# Altium PCB MacroPlay.PcbDoc (part 2 of 2)
Units mm, origin at the board's own origin, x right, y up, seen from the top; angles counter-clockwise.
Board outline 100 x 85.02 mm, 2 copper layers (Top Layer, Bottom Layer), stack 1.569 mm thick; 92 components, 57 nets, 335 pads, 121 vias.
Unrouted connection lines stored in the file: 18.
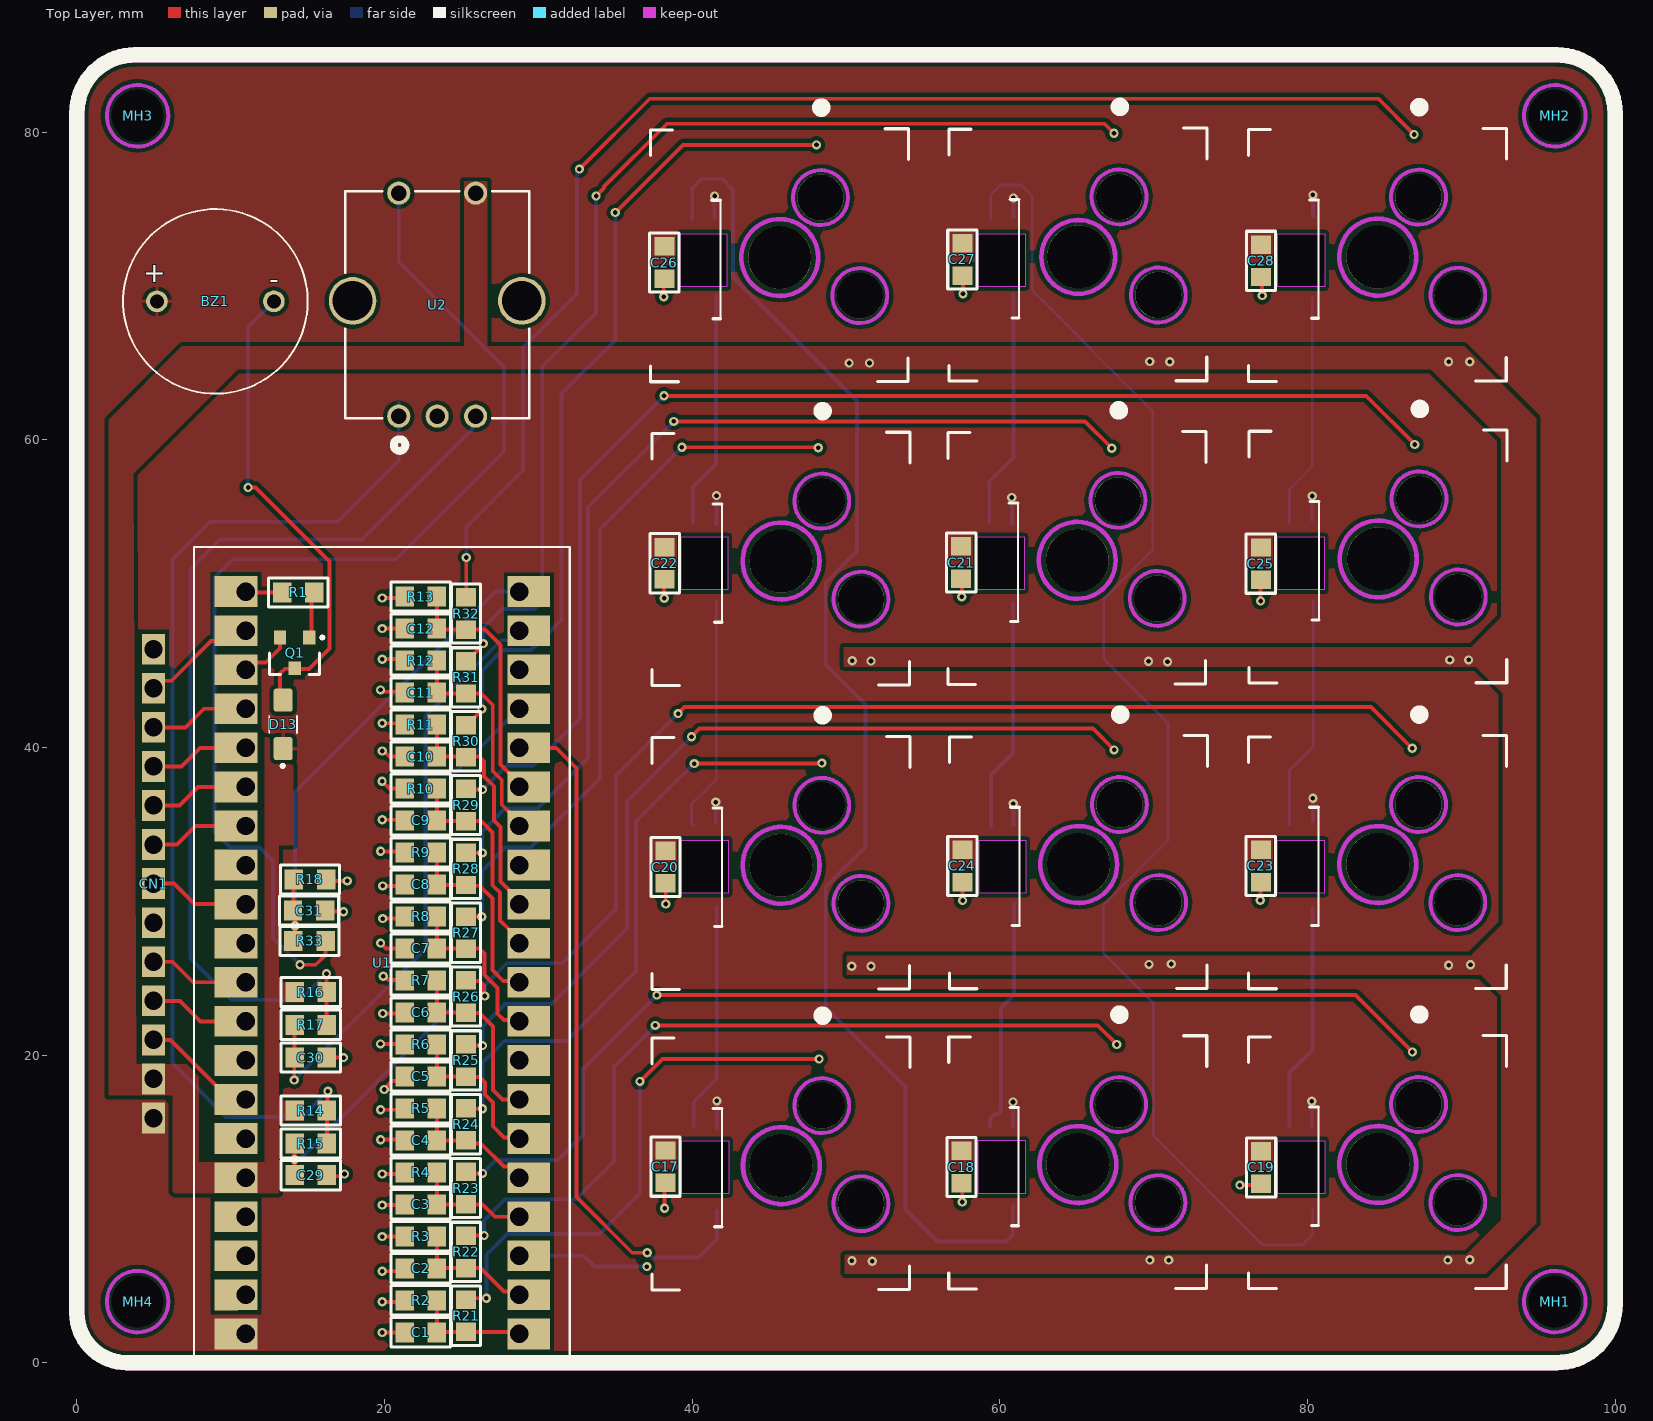
[diagram p0: Top Layer view]

## Via types
v1: diameter 0.6, hole 0.3, Top Layer to Bottom Layer, tented both sides, 85 vias
v2: diameter 0.6, hole 0.3, Top Layer to Bottom Layer, tented top, 36 vias

## Nets (pads, with @x,y where several pads share a name; then routed paths per layer and width w, separated by ;. In a path a pad name is that pad's centre, name@x,y a point inside that pad or via, vN(x,y) a via of type N, cw(c..) or ccw(c..) an arc to the next point about the centre after c; other vN are vias at no path point) (continued)
NetBZ1_N: (continued)
  Top Layer w0.254: v1(11.125,56.9) 11.6,56.9 16.414,52.086 16.414,46.439 15.09,45.115 14.185,45.115 Q1.3 14.118,45.118 13.518,45.118 13.2,44.8 13.2,43.275 D13.2
  Bottom Layer w0.254: v1(11.125,56.9) 11.125,67.325 BZ1.N
NetD1_4: D1.4 U1.GP12 | length 45.2
  Top Layer w0.254: U1.GP12@28.75,39.975 30.016,39.975 31.158,39.975 32.483,38.65 32.483,10.767 36.1,7.15 v1(37.075,7.15)
  Bottom Layer w0.254: v1(37.075,7.15) 37.102,7.15 37.397,6.855 40.406,6.855 41.6,8.049 D1.4@41.6,9.877
NetQ1_1: Q1.1 R1.2 | length 3.1
  Top Layer w0.254: Q1.1 15.25,47.3 15.25,49.892 R1.2
NetR1_1: R1.1 U1.GP16 | length 2.4
  Top Layer w0.254: U1.GP16@10.97,50.135 11.03,50.075 R1.1
NetR14_1: R14.1 R15.2 U2.A | length 69.6
  Top Layer w0.254: R15.2 R14.1 16.3,16.45 v1@16.3,17.675
  Bottom Layer w0.254: v1(16.315,17.66) 14.634,15.98 9.695,15.98 6.2,19.475 6.2,52.225 8.65,54.675 16.95,54.675 20.92,58.645 20.92,62.394
NetR16_1: R16.1 R17.2 U2.B | length 63.2
  Top Layer w0.254: v1(16.224,25.293) 16.224,22.641 16.245,22.62 R17.2
  Bottom Layer w0.254: v1(16.224,25.293) 14.531,23.6 10.058,23.6 7.375,26.283 7.375,51.6 9.3,53.525 18.525,53.525 25.683,60.683 25.683,61.301 U2.B ; U2.B@25.619,62.088 25.638,62.069 U2.B@25.638,61.238
NetR21_2: R21.2 SW1.1 | length 35.3
  Top Layer w0.254: R21.2 25.382,4.195 v1(26.62,4.195) ; v1(36.595,18.29) 38.054,19.75 v2@48.225,19.75
  Bottom Layer w0.254: v1(26.62,4.195) 26.62,7.02 27.96,8.36 33.96,8.36 36.595,10.995 v1(36.595,18.29)
  other v2: 48.244,19.75
NetR22_2: R22.2 SW2.1 | length 52.7
  Top Layer w0.254: R22.2 25.307,8.27 v1(26.47,8.27) ; v1(37.6,21.933) 66.36,21.933 v2(67.6,20.693)
  Bottom Layer w0.254: v1(26.47,8.27) 26.47,9.262 27.838,10.63 32.455,10.63 34.9,13.075 34.9,19.233 v1(37.6,21.933)
NetR23_2: R23.2 SW3.1 | length 70.4
  Top Layer w0.254: R23.2 25.391,12.312 v1(26.368,12.312) ; v1(37.7,23.9) 83.122,23.9 v2@86.825,20.197
  Bottom Layer w0.254: v1(26.368,12.312) 27.226,13.17 31.27,13.17 32.9,14.8 32.9,19.1 v1(37.7,23.9)
  other v2: 86.818,20.204
NetR24_2: R24.2 SW4.1 | length 39.9
  Top Layer w0.254: R24.2 25.341,16.512 v1(26.358,16.512) ; v1(40.125,38.95) 40.141,38.966 48.416,38.966 v2@48.425,38.975
  Bottom Layer w0.254: v1(26.358,16.512) 26.358,19.508 27.775,20.925 31.825,20.925 36.35,25.45 36.35,35.175 v1(40.125,38.95)
  other v2: 48.426,38.983
NetR25_2: R25.2 SW5.1 | length 56.8
  Top Layer w0.254: R25.2 25.386,20.617 v1(26.364,20.617) ; v1(39.95,40.7) 40.475,41.225 66.042,41.225 67.417,39.85 v2@67.425,39.85
  Bottom Layer w0.254: v1(26.364,20.617) 26.364,21.856 27.838,23.33 30.855,23.33 35.75,28.225 35.75,36.5 v1(39.95,40.7)
  other v2: 67.425,39.842
NetR26_2: R26.2 SW6.1 | length 76.7
  Top Layer w0.254: R26.2 25.34,24.813 26.177,24.813 26.464,24.526 26.464,23.895 v1(26.514,23.845) ; v1(39.08,42.204) 39.501,42.625 84.125,42.625 v2(86.8,39.95)
  Bottom Layer w0.254: v1(26.514,23.845) 26.514,24.546 27.938,25.97 31.52,25.97 35.05,29.5 35.05,38.174 v1(39.08,42.204)
NetR27_2: R27.2 SW7.1 | length 46.8
  Top Layer w0.254: R27.2 26.307,29.008 v1(26.32,28.995) ; v1(39.327,59.516) 48.184,59.516 v2@48.225,59.475
  Bottom Layer w0.254: v1(26.32,28.995) 26.32,31.972 27.838,33.49 29.49,33.49 34,38 34,54.188 v1(39.327,59.516)
  other v2: 48.187,59.484
NetR28_2: R28.2 SW8.1 | length 64.7
  Top Layer w0.254: R28.2 26.332,33.158 v1(26.345,33.145) ; v1(38.8,61.2) 65.525,61.2 v2(67.275,59.45)
  Bottom Layer w0.254: v1(26.345,33.145) 26.345,34.537 27.838,36.03 29.93,36.03 33.217,39.317 33.217,55.617 v1(38.8,61.2)
NetR29_2: R29.2 SW9.1 | length 82.7
  Top Layer w0.254: R29.2 25.342,37.261 v1(26.362,37.261) ; v1(38.161,62.859) 83.816,62.859 v2(86.975,59.7)
  Bottom Layer w0.254: v1(26.362,37.261) 27.941,38.84 29.662,38.84 32.709,41.887 32.709,57.407 v1(38.161,62.859)
NetR30_2: R30.2 SW10.1 | length 53.4
  Top Layer w0.254: R30.2 25.345,41.458 26.323,42.437 v1(26.323,42.503) ; v1(35,74.775) 39.4,79.175 v2(48.075,79.175)
  Bottom Layer w0.254: v1(26.323,42.503) 26.323,44.988 27.66,46.325 29.527,46.325 31.5,48.298 31.5,63 35,66.5 v1(35,74.775)
NetR31_2: R31.2 SW11.1 | length 70.9
  Top Layer w0.254: R31.2 25.345,45.608 26.409,46.672 v1(26.409,46.755) ; v1(33.75,75.85) 34.273,76.373 34.273,76.47 38.352,80.55 66.792,80.55 v2(67.414,79.928)
  Bottom Layer w0.254: v1(26.409,46.755) 26.409,47.784 27.625,49 29.733,49 30.25,49.517 30.25,64.75 33.75,68.25 v1(33.75,75.85)
NetR32_2: R32.2 SW12.1 | length 88
  Top Layer w0.254: R32.2 25.308,49.772 v1(25.308,52.35) ; v1(32.662,77.6) 37.237,82.175 84.6,82.175 v2(86.925,79.85)
  Bottom Layer w0.254: v1(25.308,52.35) 25.308,54.308 29,58 29,66 32.5,69.5 32.5,77.345 32.662,77.506 v1(32.662,77.6)
NetR33_1: R33.1 U2.D | length 73.2
  Top Layer w0.254: v1(14.5,25.875) 15.525,25.875 16.17,26.52 R33.1
  Bottom Layer w0.254: v1(14.5,25.875) 12.75,27.625 12.75,32.622 11.872,33.5 9.98,33.5 8.95,34.53 8.95,51.05 10.134,52.234 20.734,52.234 27.75,59.25 27.75,64.738 20.92,71.568 U2.D
SW2: D1.2 D2.4 | length 14.9
  Bottom Layer w0.254: D1.2 40.095,16.97 41.595,18.47 D2.4@41.595,29.642
SW3: D2.2 D3.4 | length 15.3
  Bottom Layer w0.18: D2.2 39.95,35.033 39.95,36.317 41.558,37.925 D3.4@41.558,49.555
SW4: D3.2 D4.4 | length 15.4
  Bottom Layer w0.254: D3.2 40.045,56.926 41.545,58.426 D4.4@41.545,69.39
SW5: D4.2 D5.4 | length 89.8
  Bottom Layer w0.254: D4.2 40,74.367 40,76.35 40.625,76.975 41.925,76.975 42.658,76.242 42.658,70.593 50.715,62.536 50.715,52.773 48.678,50.736 48.678,45.37 51.25,42.799 51.25,33.532 48.678,30.961 48.678,23.101 53.85,17.929 53.85,9.975 55.95,7.875 60.4,7.875 60.835,8.31 D5.4@60.835,10.16
SW6: D5.2 D6.4 | length 15.3
  Bottom Layer w0.254: D5.2 59.358,15.89 59.641,16.173 59.917,16.173 60.067,16.324 60.067,23.058 60.92,23.91 D6.4@60.92,29.857
SW7: D6.2 D7.4 | length 15
  Bottom Layer w0.254: D6.2 59.42,38.22 60.85,39.65 D7.4@60.85,49.37
SW8: D7.2 D8.4 | length 15.4
  Bottom Layer w0.254: D7.2 59.308,57.283 60.883,58.858 D8.4@60.883,69.446
SW9: D8.2 D9.4 | length 90.5
  Bottom Layer w0.18: D8.2 59.4,74.367 59.4,75.925 60.05,76.575 61.375,76.575 62.105,75.845 62.105,69.695 69.932,61.868 69.932,52.839 66.75,49.657 66.75,45.75 70.925,41.575 70.925,33.96 66.725,29.76 66.725,26.625 69.979,23.371 69.979,14.771 77.075,7.675 79.651,7.675 80.345,8.369 D9.4@80.345,9.969
SW10: D9.2 D10.4 | length 14.8
  Bottom Layer w0.254: D9.2 78.839,15.401 78.839,18.864 80.32,20.345 D10.4
SW11: D10.2 D11.4 | length 15.3
  Bottom Layer w0.18: D10.2 78.82,38.52 80.375,40.075 D11.4@80.375,49.577
SW12: D11.2 D12.4 | length 15.2
  Bottom Layer w0.18: D11.2 78.82,56.793 80.3,58.273 D12.4@80.3,69.226
pads on no net: D12.2 MH1. MH2. MH3. MH4. SW1. SW2. SW3. SW4. SW5. SW6. SW7. SW8. SW9. SW10. SW11. SW12. U1.3V3_EN U1.ADC_VREF U1.RUN U1.VSYS U2.6 U2.7

## Polygon pours and split planes (outlines as drawn)
+3V3 on Top Layer "Top Layer-+3V3" (solid, remove dead copper, pour order 63): 49.925,5.8 91.6,5.8 94.875,9.075 94.875,61.4 90.2,66.075 26.686,66.075 26.686,76.794 25.161,76.794 25.161,66.075 6.825,66.075 2.05,61.3 2.05,17.375 6.236,17.375 6.215,11.035 13.125,11.035 13.125,15.745 14.745,15.745 14.745,17.045 13.125,17.045 13.125,23.445 14.745,23.445 14.745,24.745 13.125,24.745 13.125,33.65 14.074,33.65 14.074,40.675 12.2,40.675 12.2,13.035 7.925,13.035 7.925,19.397 3.85,19.397 3.65,57.8 10.45,64.6 88.025,64.6 92.6,60.025 92.6,48.475 90.65,46.525 49.85,46.525 49.85,45.25 90.95,45.25 92.675,43.525 92.675,28.55 90.6,26.475 50.05,26.475 50.05,25.225 91.25,25.225 92.6,23.875 92.6,9.3 90.325,7.025 49.925,7.025
+VBUS on Top Layer "+VBUS_L01_P065" (solid, remove dead copper, pour order 65): -1.655,86.104 100.87,86.104 100.87,-1.291 -1.655,-1.291
no net on Bottom Overlay "NONET_L01_P-001" (solid): 99.51,78.275 98.352,78.275 ccw(c98.352,75.735) 95.812,75.735 95.812,74.6 99.51,74.6
no net on Bottom Overlay "NONET_L01_P-001" (solid): 95.793,10.15 95.793,9.39 ccw(c98.333,9.39) 98.333,6.85 99.5,6.85 99.5,10.15 99.068,10.15
no net on Bottom Overlay "NONET_L01_P-001" (solid): 0.375,65 3.449,65 ccw(c1.35,65.05) 1.35,67.15 0.375,67.15
no net on Bottom Overlay "NONET_L01_P-001" (solid): 3.448,15.988 cw(c1.067,15.917) 1.067,13.535 -0.005,13.535 -0.005,15.962
GND on Bottom Layer "NONET_L01_P-001" (solid, remove dead copper, pour order 54): -2.425,86.306 100.7,86.306 100.7,-0.087 -2.425,-0.087

## Keep-outs
Keep-Out Layer:
  circle w0.254: c96.079,81.065 r2
  circle w0.254: c3.939,81.065 r2
  circle w0.254: c3.939,3.977 r2
  circle w0.254: c96.079,3.977 r2
  circle w0.3: c45.772,52.116 r2.5
  circle w0.254: c48.422,56.016 r1.786
  circle w0.254: c50.972,49.641 r1.786
  circle w0.254: c87.219,16.791 r1.786
  circle w0.3: c84.569,12.891 r2.5
  circle w0.254: c89.769,10.416 r1.786
  circle w0.254: c89.769,69.402 r1.786
  circle w0.254: c87.219,75.777 r1.786
  circle w0.3: c84.569,71.877 r2.5
  circle w0.254: c87.251,56.158 r1.786
  circle w0.3: c84.601,52.258 r2.5
  circle w0.254: c89.801,49.783 r1.786
  circle w0.254: c89.769,29.916 r1.786
  circle w0.254: c87.219,36.291 r1.786
  circle w0.3: c84.569,32.391 r2.5
  circle w0.254: c48.339,75.749 r1.786
  circle w0.254: c50.889,69.374 r1.786
  circle w0.254: c50.972,29.866 r1.786
  circle w0.254: c48.422,36.241 r1.786
  circle w0.254: c67.772,36.291 r1.786
  circle w0.25: c70.322,29.916 r1.786
  circle w0.254: c70.226,49.691 r1.786
  circle w0.254: c67.676,56.066 r1.786
  circle w0.254: c70.299,69.416 r1.786
  circle w0.254: c67.749,75.791 r1.786
  circle w0.254: c70.272,10.407 r1.786
  circle w0.254: c67.722,16.782 r1.786
  circle w0.254: c50.972,10.341 r1.786
  circle w0.254: c48.422,16.716 r1.786
  circle w0.3: c45.689,71.849 r2.5
  circle w0.3: c65.099,71.891 r2.4
  circle w0.3: c65.026,52.166 r2.5
  circle w0.3: c45.772,32.341 r2.5
  circle w0.3: c65.122,32.391 r2.5
  circle w0.3: c65.072,12.882 r2.5
  circle w0.3: c45.797,12.816 r2.5
  lines w1: -0.005,3.245 ccw(c3.233,3.245) 3.233,0.007 12.677,0.007 27.033,0.007 96.201,0.007 ccw(c96.201,3.801) 99.995,3.801 99.995,81.241 ccw(c96.211,81.241) 96.211,85.025 3.775,85.025 ccw(c3.775,81.245) -0.005,81.245 -0.005,3.245

## Silkscreen, mask and mechanical layers (free items; w line width, h text height)
Top Overlay:
  lines w0.8: -0.005,3.245 ccw(c3.233,3.245) 3.233,0.007 12.677,0.007 27.033,0.007 96.201,0.007 ccw(c96.201,3.801) 99.995,3.801 99.995,81.241 ccw(c96.211,81.241) 96.211,85.025 3.775,85.025 ccw(c3.775,81.245) -0.005,81.245 -0.005,3.245
  lines w1: -0.005,3.245 ccw(c3.233,3.245) 3.233,0.007 12.677,0.007 27.033,0.007 96.201,0.007 ccw(c96.201,3.801) 99.995,3.801 99.995,81.241 ccw(c96.211,81.241) 96.211,85.025 3.775,85.025 ccw(c3.775,81.245) -0.005,81.245 -0.005,3.245
Bottom Overlay:
  lines w0.8: -0.005,3.245 ccw(c3.233,3.245) 3.233,0.007 17.565,0.007 22.056,0.007 96.201,0.007 ccw(c96.201,3.801) 99.995,3.801 99.995,81.241 ccw(c96.211,81.241) 96.211,85.025 3.775,85.025 ccw(c3.775,81.245) -0.005,81.245 -0.005,3.245
  lines w1: -0.005,3.245 ccw(c3.233,3.245) 3.233,0.007 12.677,0.007 27.033,0.007 96.201,0.007 ccw(c96.201,3.801) 99.995,3.801 99.995,81.241 ccw(c96.211,81.241) 96.211,85.025 3.775,85.025 ccw(c3.775,81.245) -0.005,81.245 -0.005,3.245
  text "Designed by Vinicius RM Carvalho and Thiago FM Laurentino in Maceió, AL" at 99.788,74.75 h2 r90
  text "GND" at 9.225,45.625 h1
  text "IO17" at 9.475,43.4 h1
  text "IO18" at 9.475,40.875 h1
  text "IO19" at 9.475,38.325 h1
  text "IO20" at 9.55,35.75 h1
  text "IO21" at 9.375,33.25 h1
  text "IO22" at 9.575,30.65 h1
  text "GND" at 9.225,28.125 h1
  text "ADC0" at 9.775,25.525 h1
  text "ADC1" at 9.55,23.1 h1
  text "https://github.com/nivuciis/MacroPlay-HW" at 27.5,22.813 h1.2
  text "ADC2" at 9.725,20.625 h1
  text "3V3" at 9.175,17.975 h1
  text "MacroPlay V1 - Configure one time use anywhere" at 0.469,15.925 h2 r270
  text "5V" at 8.65,15.45 h1
Manufacturing Notes:
  lines w0.508: 137.648,4.371 177.648,4.371 ; 137.648,8.896 177.648,8.896 ; 137.648,12.896 177.828,12.896 177.828,-0.663 ; 137.648,12.912 137.648,-0.629 177.648,-0.629 ; 170.648,8.896 170.648,12.896
  text "MANUFACTURING NOTES" at 135.753,113.562 h3
  text "BOARD INFO" at 185.753,106.646 h1.5
  text "FILES" at 136.753,106.038 h1.5
  text "GTO - Top Overlay" at 136.753,102.558 h1.5
  text "Minimum Track: 0.18mm" at 185.753,101.646 h1.5
  text "GTP - Top Paste" at 136.753,98.728 h1.5
  text "Minimum Clearance: 0.254mm" at 185.753,97.646 h1.5
  text "GTS - Top Solder" at 136.753,94.898 h1.5
  text "Minimum Through Hole VIA: 0.6mm (23.62mil) (pad) / 0.3mm (11.8mil) (Drill)" at 185.753,93.562 h1.5
  text "GTL - L1 (Positive)" at 136.753,91.568 h1.5
  text "Drilling: L1-L2" at 185.753,89.646 h1.5
  text "GBL  - L2 (Positive)" at 136.753,88.238 h1.5
  text "GBS - Bottom Solder" at 136.753,84.908 h1.5
  text "GBP - Bottom Paste" at 136.753,81.577 h1.5
  text "GBO - Bottom Overlay" at 136.753,77.747 h1.5
  text "GM3 - Manufacturing Notes" at 136.753,73.917 h1.5
  text "GM28 - Board Outline" at 136.753,70.587 h1.5
  text "'.TitleProject'" at 138.648,9.896 h1.5
  text "'.VersionRevision'" at 172.648,9.896 h1.5
  text "'.Company'" at 138.648,5.371 h1.5
  text "'.VariantName'" at 138.648,1.371 h1.5
Drill Drawing:
  circle w0.254: c134.544,33.467 r0.847
  lines w0.254: 133.697,21.613 134.121,21.613 134.544,21.19 134.967,21.613 135.391,21.613 134.967,22.037 135.391,22.46 134.967,22.46 134.544,22.883 134.121,22.46 133.697,22.46 134.121,22.037 133.697,21.613 ; 133.697,25 133.697,25.423 134.121,25.847 133.697,26.27 133.697,26.693 134.121,26.693 134.544,26.27 134.967,26.693 135.391,26.693 135.391,26.27 134.967,25.847 135.391,25.423 135.391,25 134.967,25 134.544,25.423 134.121,25 133.697,25 ; 133.697,28.81 135.391,28.81 135.391,30.503 133.697,30.503 133.697,28.81 ; 133.697,37.277 134.544,36.43 135.391,37.277 134.544,38.123 133.697,37.277 ; 133.697,40.24 134.544,40.663 135.391,40.24 134.967,41.087 135.391,41.933 134.544,41.51 133.697,41.933 134.121,41.087 133.697,40.24 ; 133.697,45.743 135.391,45.743 134.544,44.05 133.697,45.743 ; 133.697,48.283 134.121,48.283 134.121,47.86 134.967,47.86 134.967,48.283 135.391,48.283 135.391,49.13 134.967,49.13 134.967,49.553 134.121,49.553 134.121,49.13 133.697,49.13 133.697,48.283
  lines w0.381: 132.179,20.047 316.837,20.047 ; 132.179,50.527 316.837,50.527 ; 146.171,16.237 146.171,54.337 ; 161.407,16.237 161.407,54.337 ; 190.608,16.237 190.608,54.337 ; 203.458,16.237 203.458,54.337 ; 222.096,16.237 222.096,54.337 ; 260.185,16.237 260.185,54.337 ; 275.167,16.237 275.167,54.337 ; 294.11,16.237 294.11,54.337 ; 132.179,16.237 316.837,16.237 316.837,54.337 132.179,54.337 132.179,16.237
  text "Symbol" at 134.465,51.67 h1.83
  text "Count" at 147.314,51.67 h1.83
  text "Hole Size" at 162.55,51.67 h1.83
  text "Plated" at 191.751,51.67 h1.83
  text "Hole Type" at 204.601,51.67 h1.83
  text "Drill Layer Pair" at 223.239,51.67 h1.83
  text "Via/Pad" at 261.328,51.67 h1.83
  text "Pad Shape" at 276.31,51.67 h1.83
  text "Template" at 295.253,51.67 h1.83
  text "2" at 147.314,47.86 h1.52
  text "0.900mm (35.43mil)" at 162.55,47.86 h1.52
  text "PTH" at 191.751,47.86 h1.52
  text "Round" at 204.601,47.86 h1.52
  text "Top Layer - Bottom Layer" at 223.239,47.86 h1.52
  text "Pad" at 261.328,47.86 h1.52
  text "Rounded" at 276.31,47.86 h1.52
  text "c141h90" at 295.253,47.86 h1.52
  text "2" at 147.314,44.05 h1.52
  text "2.591mm (102.00mil)" at 162.55,44.05 h1.52
  text "PTH" at 191.751,44.05 h1.52
  text "Round" at 204.601,44.05 h1.52
  text "Top Layer - Bottom Layer" at 223.239,44.05 h1.52
  text "Pad" at 261.328,44.05 h1.52
  text "Rounded" at 276.31,44.05 h1.52
  text "c310h259m-1p0" at 295.253,44.05 h1.52
  text "4" at 147.314,40.24 h1.52
  text "3.400mm (133.86mil)" at 162.55,40.24 h1.52
  text "NPTH" at 191.751,40.24 h1.52
  text "Round" at 204.601,40.24 h1.52
  text "Top Layer - Bottom Layer" at 223.239,40.24 h1.52
  text "Pad" at 261.328,40.24 h1.52
  text "Rounded" at 276.31,40.24 h1.52
  text "c0hn340" at 295.253,40.24 h1.52
  text "5" at 147.314,36.43 h1.52
  text "0.991mm (39.00mil)" at 162.55,36.43 h1.52
  text "PTH" at 191.751,36.43 h1.52
  text "Round" at 204.601,36.43 h1.52
  text "Top Layer - Bottom Layer" at 223.239,36.43 h1.52
  text "Pad" at 261.328,36.43 h1.52
  text "Rounded" at 276.31,36.43 h1.52
  text "(Mixed)" at 295.253,36.43 h1.52
  text "12" at 147.314,32.62 h1.52
  text "4.089mm (161.00mil)" at 162.55,32.62 h1.52
  text "NPTH" at 191.751,32.62 h1.52
  text "Round" at 204.601,32.62 h1.52
  text "Top Layer - Bottom Layer" at 223.239,32.62 h1.52
  text "Pad" at 261.328,32.62 h1.52
  text "Rounded" at 276.31,32.62 h1.52
  text "c409hn409" at 295.253,32.62 h1.52
  text "24" at 147.314,28.81 h1.52
  text "3.000mm (118.11mil)" at 162.55,28.81 h1.52
  text "NPTH" at 191.751,28.81 h1.52
  text "Round" at 204.601,28.81 h1.52
  text "Top Layer - Bottom Layer" at 223.239,28.81 h1.52
  text "Pad" at 261.328,28.81 h1.52
  text "Rounded" at 276.31,28.81 h1.52
  text "c300hn300" at 295.253,28.81 h1.52
  text "53" at 147.314,25 h1.52
  text "1.200mm (47.24mil)" at 162.55,25 h1.52
  text "PTH" at 191.751,25 h1.52
  text "Round" at 204.601,25 h1.52
  text "Top Layer - Bottom Layer" at 223.239,25 h1.52
  text "Pad" at 261.328,25 h1.52
  text "Rounded" at 276.31,25 h1.52
  text "(Mixed)" at 295.253,25 h1.52
  text "121" at 147.314,21.19 h1.52
  text "0.300mm (11.81mil)" at 162.55,21.19 h1.52
  text "PTH" at 191.751,21.19 h1.52
  text "Round" at 204.601,21.19 h1.52
  text "Top Layer - Bottom Layer" at 223.239,21.19 h1.52
  text "Via" at 261.328,21.19 h1.52
  text "Rounded" at 276.31,21.19 h1.52
  text "(Mixed)" at 295.253,21.19 h1.52
  text "223 Total" at 147.314,17.38 h1.52
Board Outline:
  lines w0.1: -0.005,3.245 ccw(c3.233,3.245) 3.233,0.007 12.677,0.007 27.033,0.007 96.201,0.007 ccw(c96.201,3.801) 99.995,3.801 99.995,81.241 ccw(c96.211,81.241) 96.211,85.025 3.775,85.025 ccw(c3.775,81.245) -0.005,81.245 -0.005,3.245 ; 39.208,69.95 39.208,73.4 42.258,73.4 42.258,69.95 39.208,69.95 ; 39.27,50.245 39.27,53.695 42.32,53.695 42.32,50.245 39.27,50.245 ; 39.283,30.525 39.283,33.975 42.333,33.975 42.333,30.525 39.283,30.525 ; 39.32,10.995 39.32,14.445 42.37,14.445 42.37,10.995 39.32,10.995 ; 58.533,50.25 58.533,53.7 61.583,53.7 61.583,50.25 58.533,50.25 ; 58.583,11 58.583,14.45 61.633,14.45 61.633,11 58.583,11 ; 58.608,69.95 58.608,73.4 61.658,73.4 61.658,69.95 58.608,69.95 ; 58.645,30.52 58.645,33.97 61.695,33.97 61.695,30.52 58.645,30.52 ; 78.045,30.52 78.045,33.97 81.095,33.97 81.095,30.52 78.045,30.52 ; 78.045,50.245 78.045,53.695 81.095,53.695 81.095,50.245 78.045,50.245 ; 78.07,10.995 78.07,14.445 81.12,14.445 81.12,10.995 78.07,10.995 ; 78.07,69.945 78.07,73.395 81.12,73.395 81.12,69.945 78.07,69.945

## Text inside footprints (layer, text, board x,y; h text height)
BZ1: Top Overlay "+" at 4.3,70.25 h1.27; Top Overlay "-" at 12.5,69.826 h1.27